# Altium PCB DT01.PcbDoc (part 1 of 3)
Units mil, origin at the board's own origin, x right, y up, seen from the top; angles counter-clockwise.
Board outline 2134.7 x 2226.1 mil, 2 copper layers (Top Layer, Bottom Layer), stack 57.918 mil thick; 95 components, 87 nets, 468 pads, 300 vias.
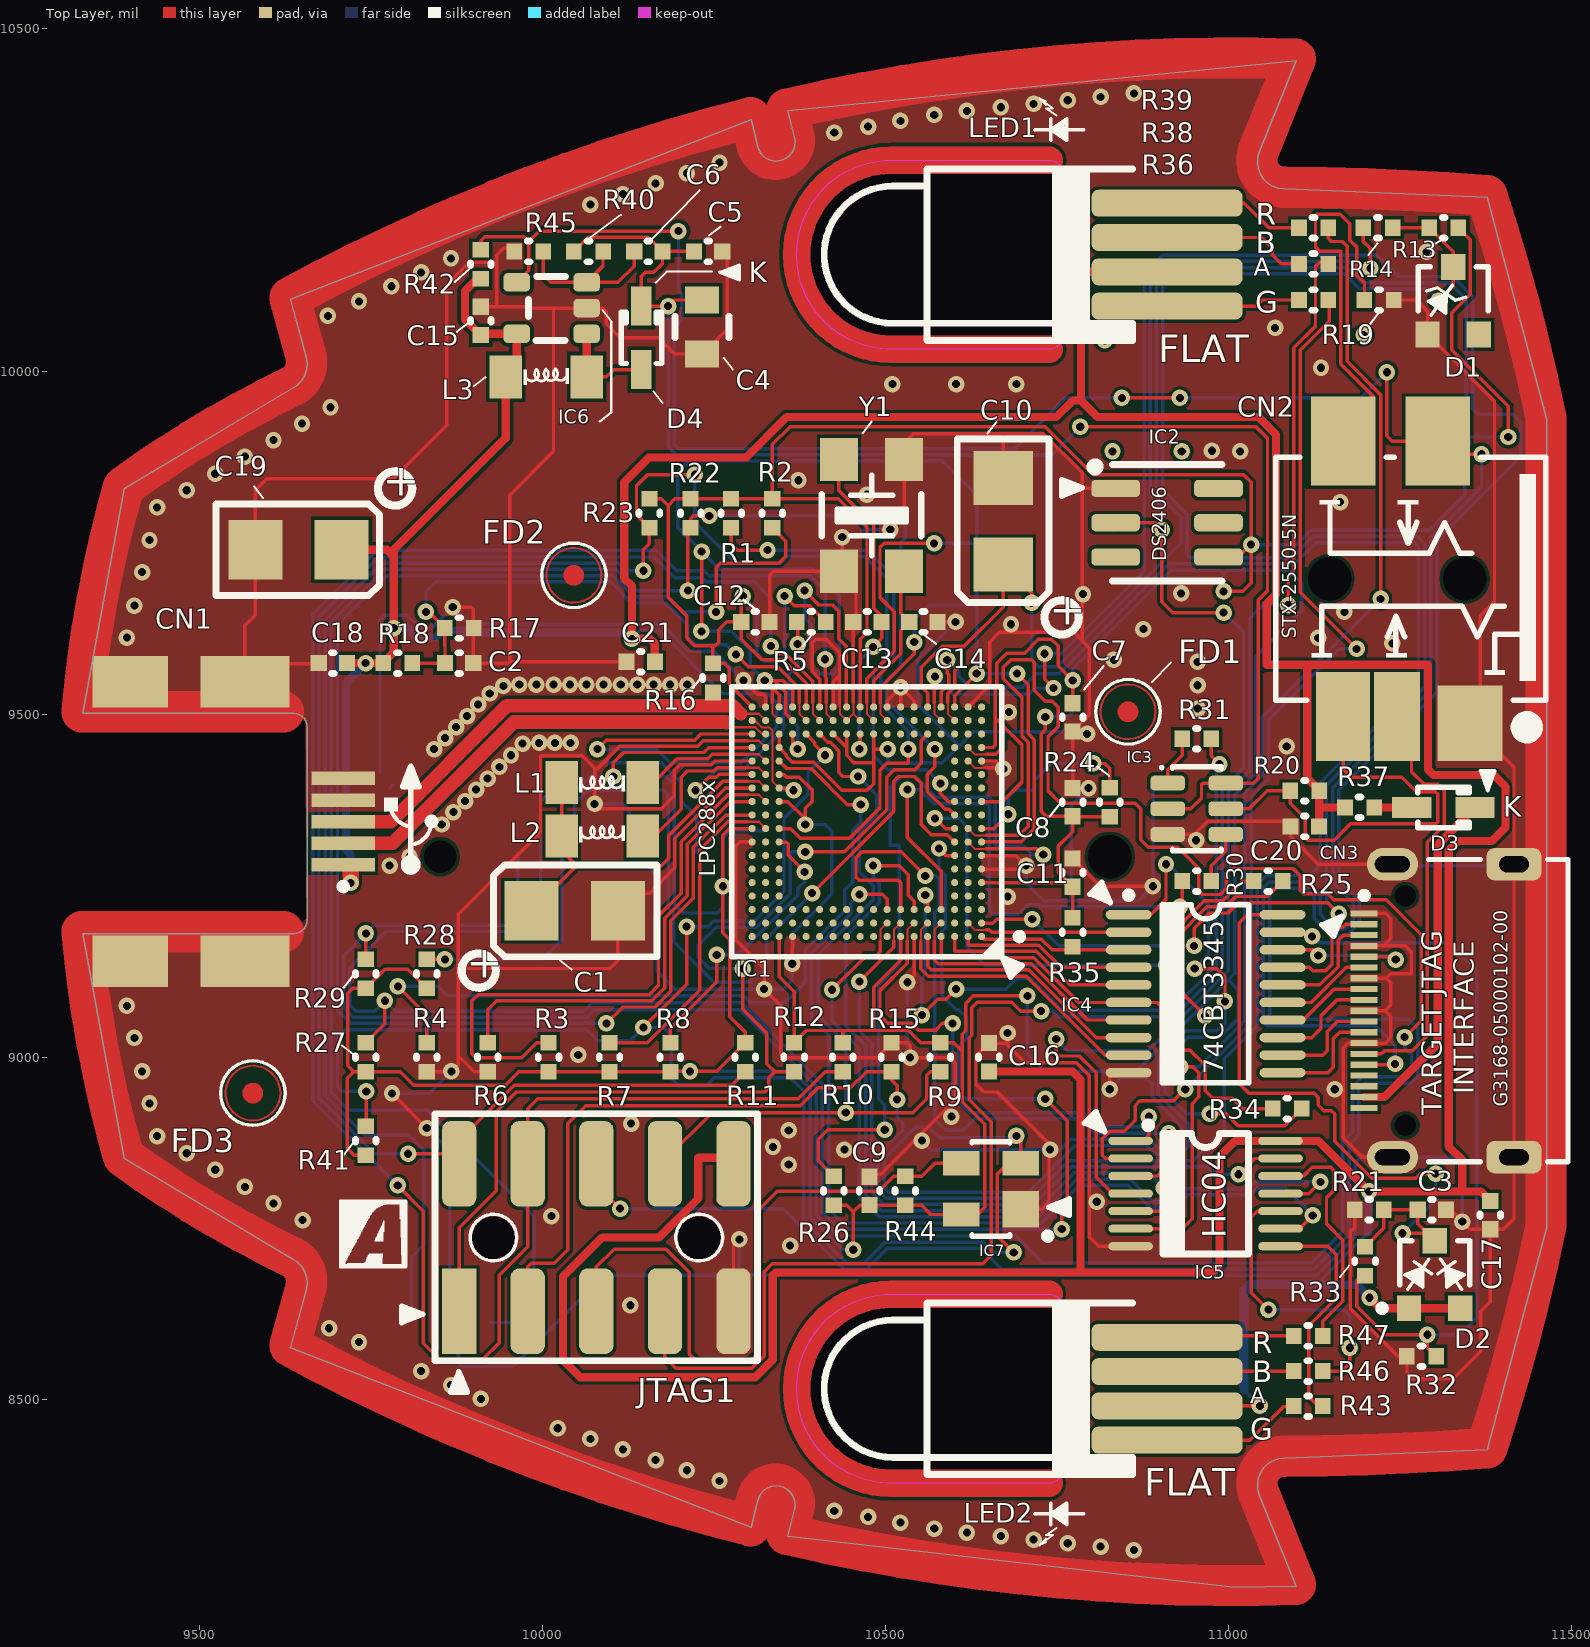
[diagram p0: Top Layer view]
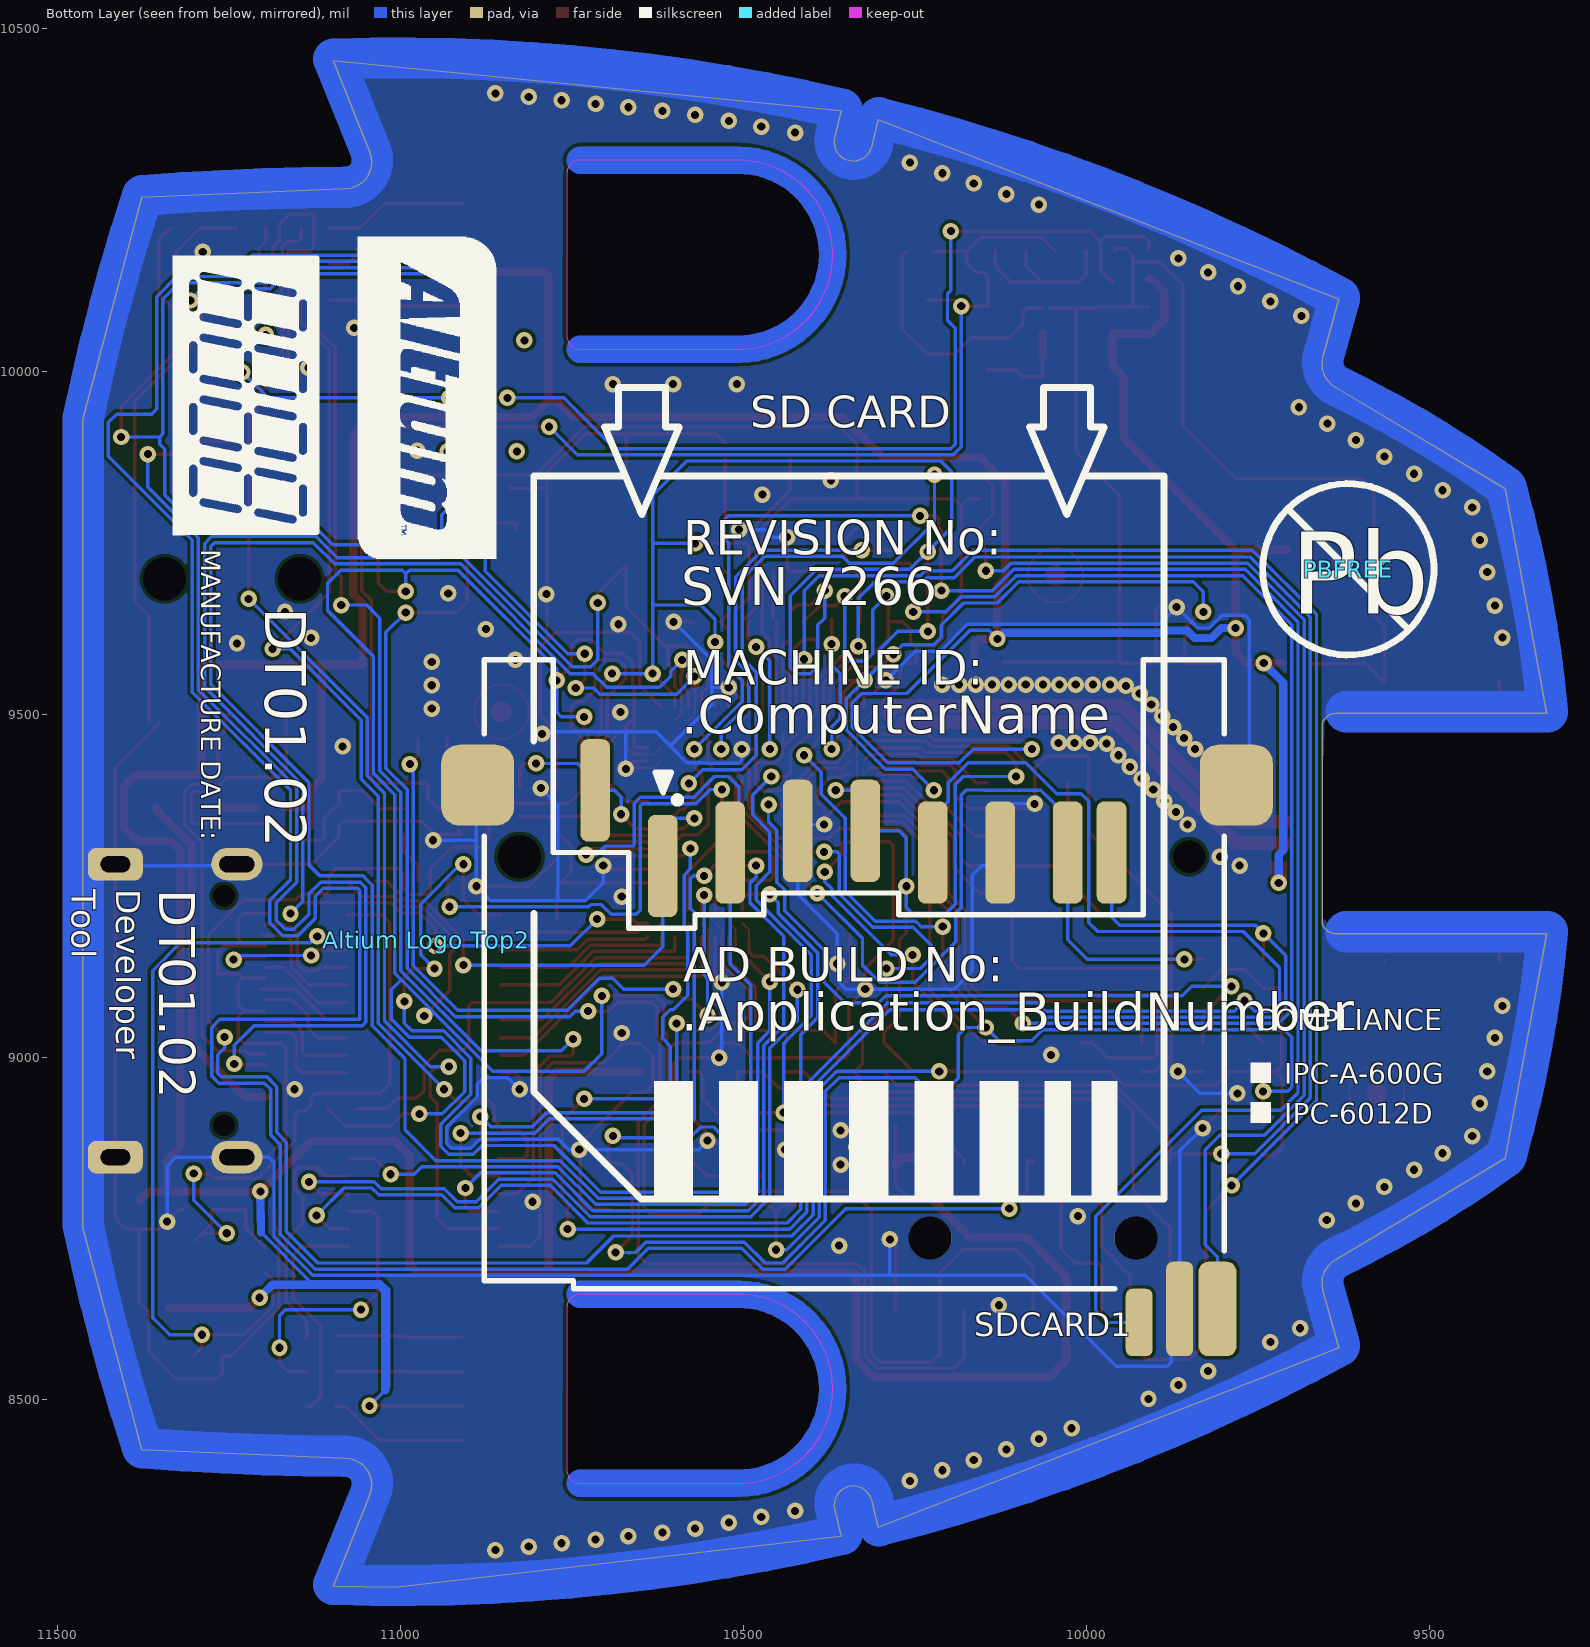
[diagram p1: Bottom Layer view, seen from below]

## Layer stack, top to bottom
Top Layer: signal copper 1.4
Dielectric: core 55.1181, FR-4, Dk 4.8
Bottom Layer: signal copper 1.4

## Board outline
9632.47,8576.36 9655.61,8660.1 9657,8669.12 9656.28,8678.21 9653.49,8686.9 9648.77,8694.71 9642.38,8701.23 9634.66,8706.09 9389.82,8852.38 9329.39,9180.02 9637.16,9180.02 9641.54,9180.52 9645.7,9181.97 9649.44,9184.32 9652.55,9187.43 9654.9,9191.17 9656.35,9195.33 9656.85,9199.71 9656.85,9481.2 9656.35,9485.58 9654.9,9489.74 9652.55,9493.48 9649.44,9496.59 9645.7,9498.94 9641.54,9500.39 9637.16,9500.89 9329.39,9500.89 9389.82,9828.53 9634.66,9974.82 9642.38,9979.68 9648.77,9986.2 9653.49,9994.01 9656.28,10002.7 9657,10011.79 9655.61,10020.81 9632.47,10104.55 10304.11,10366.84 10313.82,10327.29 10315.77,10321.87 10318.81,10316.97 10322.8,10312.81 10327.56,10309.57 10332.89,10307.39 10338.56,10306.37 10344.32,10306.55 10349.92,10307.93 10355.11,10310.43 10359.66,10313.96 10363.38,10318.36 10366.1,10323.44 10367.71,10328.97 10368.13,10334.72 10367.35,10340.43 10357.69,10379.8 11098.79,10452.79 11045.28,10319.67 11042.98,10311.48 11042.49,10302.98 11043.84,10294.58 11046.96,10286.67 11051.71,10279.61 11057.86,10273.73 11065.14,10269.32 11073.19,10266.57 11081.64,10265.62 11377.54,10253.65 11464.09,9929.39 11464.09,8751.52 11377.54,8427.26 11081.64,8415.29 11073.19,8414.34 11065.14,8411.59 11057.86,8407.18 11051.71,8401.3 11046.96,8394.24 11043.84,8386.33 11042.49,8377.93 11042.98,8369.43 11045.28,8361.24 11098.79,8228.12 11008.37,8226.7 10357.69,8301.11 10367.35,8340.48 10368.12,8345.97 10367.79,8351.49 10366.35,8356.84 10363.87,8361.79 10360.45,8366.15 10356.24,8369.74 10351.38,8372.41 10346.1,8374.06 10340.59,8374.61 10334.53,8373.94 10328.76,8371.95 10323.58,8368.74 10319.23,8364.47 10315.92,8359.35 10313.82,8353.62 10304.11,8314.07
cut-out: 10508.24,10032.02 cw(c10508.24,10169.82) 10508.24,10307.61 10738.55,10307.61 cw(c10738.55,10287.93) 10758.24,10287.93 10758.24,10051.71 cw(c10738.55,10051.71) 10738.55,10032.02
cut-out: 10508.24,8378.48 cw(c10508.24,8516.27) 10508.24,8654.07 10738.55,8654.07 cw(c10738.55,8634.38) 10758.24,8634.38 10758.24,8398.16 cw(c10738.55,8398.16) 10738.55,8378.48

## Design rules (kind name [scope] priority, off if disabled: settings)
Clearance [All] p1: gap=3
ComponentClearance [All] p1: gap=10 collisioncheckmode=3 verticalgap=9.21 showdistances=TRUE
FabricationTestPointUsage TestPointUsage [All] p1: valid=0 allowmultiple=FALSE
FabricationTestpoint Testpoint [All] p1: side=3 testpointundercomponent=TRUE minsize=40 maxsize=100 preferedsize=60 minholesize=0 maxholesize=40 preferedholesize=32 testpointgrid=1 allowsidetop=TRUE allowsidebottom=TRUE usegrid=TRUE gridtolerance=0.01
MinimumSolderMaskSliver [All] p1: minsoldermaskwidth=2.9
PolygonConnect [All] p1: connectstyle=Direct reliefconductorwidth=10 reliefentries=4 polygonreliefangle="90 Angle"
RoomDefinition U_Visual_Indicators [InComponentClass('U_Visual_Indicators')] p1: confinementstyle=ConfineIn formatcopy=TRUE lockcomponents=FALSE outline 10395.6,8376.32 10395.6,10309.87 11080.91,10309.87 11080.91,10239.02 11168.13,10239.02 11168.13,10073.73 11160.25,10073.73 11160.25,8460.95 11072.72,8460.95 11072.72,8376.32
RoomDefinition U_SD_Card_Socket [InComponentClass('U_SD_Card_Socket')] p2: confinementstyle=ConfineIn formatcopy=TRUE lockcomponents=FALSE outline 9712.34,8955.68 9712.34,9165.24 9717.12,9165.24 9717.12,9593.7 10125.87,9593.7 10125.87,9836.79 10245.89,9836.79 10245.89,9593.7 10952.72,9593.7 10952.72,9286.51 11102.19,9286.51 11102.19,9226.51 10952.72,9226.51 10952.72,8552.23 9717.12,8552.23 9717.12,8955.68
RoomDefinition U_Power_Bypass_Caps [InComponentClass('U_Power_Bypass_Caps')] p3: confinementstyle=ConfineIn formatcopy=TRUE lockcomponents=FALSE outline 9509.11,9657.72 9509.11,9821.58 10589.56,9821.58 10589.56,9916.06 10753.41,9916.06 10753.41,9539.11 10802.84,9539.11 10802.84,9366.21 11155.31,9366.21 11155.31,8813.39 11411.93,8813.39 11411.93,8725.43 11351.93,8725.43 11351.93,8760.87 10446.65,8760.87 10446.65,9544.34 9650.39,9544.34 9650.39,9657.72
RoomDefinition U_One-Wire_Write_Read [InComponentClass('U_One-Wire_Write_Read')] p4: confinementstyle=ConfineIn formatcopy=TRUE lockcomponents=FALSE outline 9879.87,10029.25 9879.87,10199.88 9935.73,10199.88 9935.73,10204.58 10285.46,10204.58 10285.46,10134.93 10286.91,10134.93 10286.91,10133.73 11263.57,10133.73 11263.57,9974.59 11553.33,9974.59 11553.33,9420.09 11155.33,9420.09 11155.33,9358.36 11032.72,9358.36 11032.72,9287.02 10997.89,9287.02 10997.89,9226.51 10909.89,9226.51 10909.89,9287.02 10875.07,9287.02 10875.07,9948.56 9911.14,9948.56 9911.14,10029.25
RoomDefinition U_Mini_USB_Socket [InComponentClass('U_Mini_USB_Socket')] p5: confinementstyle=ConfineIn formatcopy=TRUE lockcomponents=FALSE outline 9254.8,9090.36 9254.8,9595.84 9744.84,9595.84 9744.84,9604.34 9834.38,9604.34 9834.38,9655.51 9922.38,9655.51 9922.38,9596.67 10278.36,9596.67 10278.36,9508.67 9767.14,9508.67 9767.14,9090.36
RoomDefinition U_MCU_Debug [InComponentClass('U_MCU_Debug')] p6: confinementstyle=ConfineIn formatcopy=TRUE lockcomponents=FALSE outline 9816.28,8542.21 9816.28,8932.21 10336.28,8932.21 10336.28,8542.21
RoomDefinition U_MCU [InComponentClass('U_MCU')] p7: confinementstyle=ConfineIn formatcopy=TRUE lockcomponents=FALSE outline 9712.34,8834.13 9712.34,8922.13 9801.15,8922.13 9801.15,9043.68 9913.53,9043.68 9913.53,9295.14 9992.81,9295.14 9992.81,9458.72 10224.66,9458.72 10224.66,9591.16 10244.93,9591.16 10244.93,9836.79 10392.1,9836.79 10392.1,9914.33 10567.1,9914.33 10567.1,9664.36 10599.35,9664.36 10599.35,9591.16 10721.03,9591.16 10721.03,8890.64 10756.29,8890.64 10756.29,8719.06 10572.39,8719.06 10572.39,8760.85 10498.81,8760.85 10498.81,8834.13
RoomDefinition U_IO_Bus_Switch [InComponentClass('U_IO_Bus_Switch')] p8: confinementstyle=ConfineIn formatcopy=TRUE lockcomponents=FALSE outline 10742.84,9137.89 10742.84,9225.89 10799.23,9225.89 10799.23,9255.87 11134.19,9255.87 11134.19,8807.18 11340.68,8807.18 11340.68,8762.22 11367.35,8762.22 11367.35,8603.39 11325.56,8603.39 11325.56,8533.75 11237.56,8533.75 11237.56,8603.39 11204.12,8603.39 11204.12,8658.39 11169.29,8658.39 11169.29,8747.18 11161.19,8747.18 11041.74,8747.18 11041.74,8894.88 11041.74,8940.59 10799.23,8940.59 10799.23,9137.89
RoomDefinition U_Hard_Soft_JTAG_Socket [InComponentClass('U_Hard_Soft_JTAG_Socket')] p9: confinementstyle=ConfineIn formatcopy=TRUE lockcomponents=FALSE outline 11147.18,9334 11147.18,9394 11227.23,9394 11227.23,9407.23 11399.84,9407.23 11399.84,9316.28 11509.04,9316.28 11509.04,8818.87 11166.67,8818.87 11166.67,9334
RoomDefinition U_DT01_Mounts [InComponentClass('U_DT01_Mounts')] p10: confinementstyle=ConfineIn formatcopy=TRUE lockcomponents=FALSE outline 9518.12,8887.88 9518.12,9006.88 9518.12,9761.88 9986.12,9761.88 10105.12,9761.88 10105.12,9562.88 10913.12,9562.88 10913.12,9443.88 9637.12,9443.88 9637.12,8887.88
RoomDefinition DT01_ID [InComponentClass('DT01_ID')] p11: confinementstyle=ConfineIn formatcopy=TRUE lockcomponents=FALSE outline 10783.23,9679.01 10783.23,9882.81 11174.1,9882.81 11174.1,10239.02 11358.04,10239.02 11358.04,10182.16 11394.43,10182.16 11394.43,10023.33 11394.43,9679.01 11032.6,9679.01
RoutingVias [All] p1: holewidth=11.81 width=24 viastyle="Through Hole" minholewidth=11 minwidth=24 maxholewidth=12 maxwidth=28
SilkToSilkClearance SilkToSilkClearance_InvToFill [(ObjectKind = 'Text') And (TextKind <> 'Stroke Font') vs IsFill or Istrack] p1: silktosilkclearance=0
SilkToSilkClearance SilkToSilkClearance_Labels [(ObjectKind = 'Text') And (TextKind <> 'Stroke Font') vs (ObjectKind = 'Text') And (TextKind <> 'Stroke Font')] p2: silktosilkclearance=0
SilkToSilkClearance SilkToSilkClearance_Pb [(ObjectKind = 'Text') And (StringText = 'Pb') vs Istrack and onsilkscreen] p3: silktosilkclearance=0
SilkToSilkClearance SilkToSilkClearance_IC1 [incomponent('IC1') vs isdesignator] p4: silktosilkclearance=0
SilkToSilkClearance SilkToSilkClearance_+ [(ObjectKind = 'Text') And (StringText = '+') And (IsTextInverted = 'True') And (TextKind = 'TrueType Font') vs isarc and onsilkscreen] p5: silktosilkclearance=0
SilkToSilkClearance [All] p6: silktosilkclearance=4
SilkscreenOverComponentPads SilkscreenOverComponentPads_JTAG1 [isthrupin and InComponent('JTAG1') vs isarc and onsilkscreen] p1: minsilkscreentomaskgap=0
SilkscreenOverComponentPads SilkscreenOverComponentPads_LEDs [incomponent('LED1') or incomponent('LED2')] p2: minsilkscreentomaskgap=0
SilkscreenOverComponentPads [All] p3: minsilkscreentomaskgap=1
SolderMaskExpansion [All] p1: expansion=4
Width [All] p1: maxlimit=60 minlimit=3 preferedwidth=5
22 further rules are at their usual default settings.

## Classes and differential pairs
component class DT01_ID: D1 IC2 R13 R14
component class U_DT01_Mounts: FD1 FD2 FD3 PCB1
component class U_Hard_Soft_JTAG_Socket: CN3 D3 R37
component class U_IO_Bus_Switch: C3 D2 IC4 R21 R32 R33 R34 R35
component class U_MCU_Debug: JTAG1
component class U_MCU: C1 C13 C14 IC1 IC7 L1 L2 R1 R2 R3 R4 R5 R6 R7 R8 R9 R10 R11 R12 R15 R41 R44 Y1
component class U_Mini_USB_Socket: C2 CN1 R16 R17 R18
component class U_One-Wire_Write_Read: C4 C5 C6 C15 CN2 D4 IC3 IC6 L3 R19 R20 R30 R31 R40 R42 R45
component class U_Power_Bypass_Caps: C7 C8 C9 C10 C11 C12 C16 C17 C18 C19 C20 C21
component class U_SD_Card_Socket: R22 R23 R24 R25 R26 R27 R28 R29 SDCARD1
component class U_Visual_Indicators: IC5 LED1 LED2 R36 R38 R39 R43 R46 R47

## Components (designator, comment, footprint, x,y, rotation, side; value= is the part's Value field where it differs from the comment)
"Altium Logo Top2" "Generic No Pins" "NB2 ALTIUM LOGO" 10962.91,9170.78 r270 bottom (schematic designator "Altium Logo Top1")
C1 "47uF 10V" CAPC3528-STAR 10046.65,9213.21 r0 top locked (schematic designator C1_CP)
C2 "0.1uF 16V" CAPC1005-STAR 9878.38,9574.34 r180 top locked (schematic designator C1_US)
C3 "0.1uF 16V" CAPC1005-STAR 11296.7,8777.18 r0 top (schematic designator C13)
C4 "2.2uF 16V" CAPC2012-STAR 10232.62,10064.37 r90 top locked (schematic designator C3_12V)
C5 "0.1uF 16V" CAPC1005-STAR 10241.48,10174.58 r180 top locked (schematic designator C4_12V)
C6 "0.1uF 16V" CAPC1005-STAR 10154.22,10174.58 r0 top locked (schematic designator C2_12V)
C7 "0.1uF 16V" CAPC1005-STAR 10772.84,9495.13 r90 top locked (schematic designator C2_3V3)
C8 "0.1uF 16V" CAPC1005-STAR 10772.84,9371.64 r270 top (schematic designator C4_3V3)
C9 "0.1uF 16V" CAPC1005-STAR 10476.65,8804.85 r270 top locked (schematic designator C5_3V3)
C10 "47uF 10V" CAPC3528-STAR 10671.49,9780.98 r90 top locked (schematic designator C1_3V3)
C11 "0.1uF 16V" CAPC1005-STAR 10772.84,9268.82 r90 top (schematic designator C3_3V3)
C12 "0.1uF 16V" CAPC1005-STAR 10310.36,9634.36 r0 top locked (schematic designator C6_3V3)
C13 "39pF 50V 1005 COG" CAPC1005-STAR 10473.7,9634.36 r180 top locked (schematic designator C7_CP)
C14 "39pF 50V 1005 COG" CAPC1005-STAR 10555.37,9634.36 r0 top locked (schematic designator C8_CP)
C15 "0.1uF 16V" CAPC1005-STAR 9909.87,10073.23 r270 top locked (schematic designator C1_12V)
C16 "0.1uF 16V" CAPC1005-STAR 10650.82,8999.68 r270 top locked (schematic designator C2_5V0)
C17 "0.1uF 16V" CAPC1005-STAR 11381.93,8769.41 r90 top (schematic designator C4_5V0)
C18 "0.1uF 16V" CAPC1005-STAR 9694.37,9574.34 r0 top locked (schematic designator C5_5V0)
C19 "47uF 10V" CAPC3528-STAR 9644.19,9739.65 r180 top locked (schematic designator C1_5V0)
C20 "0.1uF 16V" CAPC1005-STAR 11111.33,9336.21 r180 top locked (schematic designator C3_5V0)
C21 "0.1uF 16V" CAPC1005-STAR 10143.08,9576.31 r180 top (schematic designator C6_5V0)
CN1 "0481900001" 481900001 9550.71,9343.1 r180 top locked (schematic designator CN1_US)
CN2 "PHONEJACK STEREO SW" STX-2550-5N-TR 11462.62,9697.34 r180 top locked
CN3 "HDMI19" G3168-0500XXXX-00 11455.73,9067.58 r0 top locked (schematic designator CN1)
D1 "3.3V" SOT95P230-3D 11327.81,10102.75 r0 top locked (schematic designator D1_ID)
D2 "BAV70TT1G" SOT95P230-3 11258.33,8628.59 r0 top (schematic designator D1)
D3 "ZHCS400" SOD323 11313.53,9363.76 r0 top locked (schematic designator D1_JTAG)
D4 "ZHCS400" SOD323 10144.06,10048.63 r90 top locked (schematic designator D1_12V)
FD1 "Fiducial - Round" "FIDUCIAL 2" 10853.62,9503.38 r90 top locked
FD2 "Fiducial - Round" "FIDUCIAL 2" 10045.62,9702.38 r90 top
FD3 "Fiducial - Round" "FIDUCIAL 2" 9577.62,8947.38 r90 top locked
IC1 "MC/ARM/LPC2888-SQ180" BGA50P18X18-180 9970.88,9844.94 r180 top locked (schematic designator IC1_CP)
IC2 "DS2406" TSOC6 10910.6,9779.01 r270 top locked (schematic designator IC1_ID)
IC3 "MAX4561" SOT23-6 10953.89,9361.98 r270 top locked (schematic designator IC1_1WB)
IC4 "SN74CBT3345CPWR" TSOP65P650-20 10966.71,9092.33 r0 top locked (schematic designator IC2)
IC5 "74VHC04" TSSOP14 10857.46,8877.66 r0 top locked (schematic designator IC1_LED)
IC6 "ZXLD1615" SOT-23-5 10064.36,10054.53 r90 top locked (schematic designator IC1_12V)
IC7 "MAX6315US26D1" SOT143 10653.77,8807.8 r90 top locked (schematic designator IC2_CP)
JTAG1 "TSM-105-01-S-DV" TSM-105-01-DV 9878.38,8844.21 r0 top locked (schematic designator JTAG)
L1 "10uH (LQH32CN100K33L)" 3261 10086.99,9400.17 r0 top locked (schematic designator L2_CP)
L2 "10uH (LQH32CN100K33L)" 3261 10086.99,9322.43 r0 top locked (schematic designator L1_CP)
L3 "10uH (LQH32CN100K33L)" 3261 10005.32,9991.56 r0 top locked (schematic designator L1_12V)
LED1 "RGB LED 5MM" LED-RGB-5MM-RA 10910.6,10244.87 r270 top locked
LED2 "RGB LED 5MM" LED-RGB-5MM-RA 10910.6,8591.32 r270 top locked
PBFREE "" LEAD_FREE_S 9618.6,9711.1 r180 bottom
R1 "4K7 1%" RESC1005-STAR 10274.93,9792.79 r90 top locked (schematic designator R13_CP)
R2 "4K7 1%" RESC1005-STAR 10334.96,9792.79 r90 top locked (schematic designator R14_CP)
R3 "4K7 1%" RESC1005-STAR 10008.76,8999.68 r270 top locked (schematic designator R4_CP)
R4 "12K 1%" RESC1005-STAR 9831.15,8999.68 r270 top (schematic designator R2_CP)
R5 "1K5 1%" RESC1005-STAR 10392.05,9634.36 r0 top (schematic designator R3_CP)
R6 "4K7 1%" RESC1005-STAR 9919.96,8999.68 r270 top locked (schematic designator R5_CP)
R7 "4K7 1%" RESC1005-STAR 10097.57,8999.68 r270 top locked (schematic designator R6_CP)
R8 "4K7 1%" RESC1005-STAR 10186.37,8999.68 r270 top locked (schematic designator R7_CP)
R9 "4K7 1%" RESC1005-STAR 10579.97,8999.68 r90 top locked (schematic designator R8_CP)
R10 "4K7 1%" RESC1005-STAR 10437.79,8999.68 r90 top locked (schematic designator R9_CP)
R11 "4K7 1%" RESC1005-STAR 10295.6,8999.68 r90 top locked (schematic designator R10_CP)
R12 "4K7 1%" RESC1005-STAR 10366.69,8999.68 r90 top locked (schematic designator R11_CP)
R13 "10K 1%" RESC1005-STAR 11314.04,10209.02 r0 top locked (schematic designator R1_ID)
R14 "1K 1%" RESC1005-STAR 11218.1,10209.02 r180 top locked (schematic designator R2_ID)
R15 "4K7 1%" RESC1005-STAR 10508.88,8999.68 r90 top locked (schematic designator R12_CP)
R16 "1M 1%" RESC1005-STAR 10248.36,9552.67 r90 top (schematic designator R1_US)
R17 "180K 1%" RESC1005-STAR 9878.38,9625.51 r0 top locked (schematic designator R3_US)
R18 "100K 1%" RESC1005-STAR 9788.84,9574.34 r180 top locked (schematic designator R2_US)
R19 "1K 1%" RESC1005-STAR 11219.57,10103.73 r0 top locked (schematic designator R4_1WB)
R20 "4K7 1%" RESC1005-STAR 11111.33,9388.36 r0 top locked (schematic designator R3_1WB)
R21 "1K 1%" RESC1005-STAR 11205.19,8777.18 r180 top (schematic designator R10)
R22 "4K7 1%" RESC1005-STAR 10215.89,9792.79 r90 top locked (schematic designator R15_CP)
R23 "4K7 1%" RESC1005-STAR 10155.87,9792.79 r90 top locked (schematic designator R16_CP)
R24 "4K7 1%" RESC1005-STAR 10826.95,9371.62 r270 top (schematic designator R17_CP)
R25 "4K7 1%" RESC1005-STAR 11058.19,9256.51 r0 top (schematic designator R18_CP)
R26 "4K7 1%" RESC1005-STAR 10424.49,8804.89 r270 top (schematic designator R19_CP)
R27 "4K7 1%" RESC1005-STAR 9742.34,8999.68 r270 top (schematic designator R20_CP)
R28 "4K7 1%" RESC1005-STAR 9831.15,9121.24 r270 top (schematic designator R21_CP)
R29 "4K7 1%" RESC1005-STAR 9742.34,9121.24 r270 top (schematic designator R22_CP)
R30 "100R 1%" RESC1005-STAR 10953.89,9256.51 r0 top (schematic designator R1_1WB)
R31 "100R 1%" RESC1005-STAR 10953.89,9464.13 r180 top locked (schematic designator R2_1WB)
R32 "4K7 1%" RESC1005-STAR 11281.56,8563.75 r0 top (schematic designator R27)
R33 "4K7 1%" RESC1005-STAR 11199.29,8702.39 r270 top (schematic designator R28)
R34 "4K7 1%" RESC1005-STAR 11085.74,8924.88 r0 top (schematic designator R26_CP)
R35 "4K7 1%" RESC1005-STAR 10772.84,9181.89 r90 top (schematic designator R25_CP)
R36 "150R 1%" RESC1005-STAR 11124.13,10103.73 r0 top locked (schematic designator R1_LED)
R37 "150R 1%" RESC1005-STAR 11191.18,9364 r0 top (schematic designator R1)
R38 "150R 1%" RESC1005-STAR 11124.13,10156.37 r0 top locked (schematic designator R2_LED)
R39 "150R 1%" RESC1005-STAR 11124.13,10209.02 r0 top locked (schematic designator R3_LED)
R40 "1M 1%" RESC1005-STAR 10066.99,10174.58 r180 top locked (schematic designator R2_12V)
R41 "4K7 1%" RESC1005-STAR 9742.34,8878.13 r270 top (schematic designator R23_CP)
R42 "10K 1%" RESC1005-STAR 9909.87,10155.88 r90 top locked (schematic designator R3_12V)
R43 "150R 1%" RESC1005-STAR 11116.25,8490.95 r0 top locked (schematic designator R4_LED)
R44 "4K7 1%" RESC1005-STAR 10528.81,8804.85 r270 top locked (schematic designator R1_CP)
R45 "91K 1%" RESC1005-STAR 9979.73,10174.58 r0 top locked (schematic designator R1_12V)
R46 "150R 1%" RESC1005-STAR 11116.25,8542.12 r0 top locked (schematic designator R5_LED)
R47 "150R 1%" RESC1005-STAR 11116.25,8593.29 r0 top (schematic designator R6_LED)
SDCARD1 "SDAMB-012" SDAMB-012 10334.92,9004.68 r0 bottom locked (schematic designator SDCARD)
Y1 "12MHz XTAL" XTAL-200X126-4 10479.6,9789.83 r270 top locked (schematic designator Y1_CP)

## Footprints (in the part's own frame and the unit in brackets; to place one, negate y for a bottom-side part, rotate by r counter-clockwise, add the part's x,y. Pads: shape width x height; smd on the part's side, far side on the other; paste and mask are expansions set on the pad)
3261 [mm] "3216 Chip; Chip Inductor; Body 3.2 x 1.6 mm (LxW typ)"
  rect 1.2x1.6 smd paste+0.038 mask+0.038: 1(-1.5,0) 2(1.5,0)
  body extent -1.63,-0.77 1.7,1.23, height 1.73
481900001 [mm] "Connector; USB Mini-B, Sinking Type, SM; 5 Position; Right Angle"
  rect 2.35x0.5 smd paste+0.038 mask+0.038: 1(-4.03,1.6) 2(-4.03,0.8) 3(-4.03,0) 4(-4.03,-0.8) 5(-4.03,-1.6)
  rect 3.302x1.905 smd paste+0.038 mask+0.038: MH1(-0.387,-5.175) MH4(-0.387,5.175)
  rect 2.794x1.905 smd paste+0.038 mask+0.038: MH2(3.863,-5.175) MH3(3.863,5.175)
  silkscreen extent -4.16,2.28 -3.91,2.52, body extent -4.5,-5.55 6.51,5.45, height 1.4
BGA50P18X18-180 [mil] "BGA, 180-Leads, Body 10x10mm, Pitch 0.5mm"
  round 10.5 smd paste+1.5 mask+1.5: A1(-669.29,669.29) A2(-649.61,669.29) A3(-629.92,669.29) A4(-610.24,669.29) A5(-590.55,669.29) A6(-570.87,669.29) A7(-551.18,669.29) A8(-531.5,669.29) A9(-511.81,669.29) A10(-492.13,669.29) A11(-472.44,669.29) A12(-452.76,669.29) A13(-433.07,669.29) A14(-413.39,669.29) A15(-393.7,669.29) A16(-374.02,669.29) A17(-354.33,669.29) A18(-334.65,669.29) B1(-669.29,649.61) B2(-649.61,649.61) B3(-629.92,649.61) B4(-610.24,649.61) B5(-590.55,649.61) B6(-570.87,649.61) B7(-551.18,649.61) B8(-531.5,649.61) B9(-511.81,649.61) B10(-492.13,649.61) B11(-472.44,649.61) B12(-452.76,649.61) B13(-433.07,649.61) B14(-413.39,649.61) B15(-393.7,649.61) B16(-374.02,649.61) B17(-354.33,649.61) B18(-334.65,649.61) C1(-669.29,629.92) C2(-649.61,629.92) C3(-629.92,629.92) C4(-610.24,629.92) C5(-590.55,629.92) C6(-570.87,629.92) C7(-551.18,629.92) C8(-531.5,629.92) C9(-511.81,629.92) C10(-492.13,629.92) C11(-472.44,629.92) C12(-452.76,629.92) C13(-433.07,629.92) C14(-413.39,629.92) C15(-393.7,629.92) C16(-374.02,629.92) C17(-354.33,629.92) C18(-334.65,629.92) D1(-669.29,610.24) D2(-649.61,610.24) D3(-629.92,610.24) D16(-374.02,610.24) D17(-354.33,610.24) D18(-334.65,610.24) E1(-669.29,590.55) E2(-649.61,590.55) E3(-629.92,590.55) E16(-374.02,590.55) E17(-354.33,590.55) E18(-334.65,590.55) F1(-669.29,570.87) F2(-649.61,570.87) F3(-629.92,570.87) F16(-374.02,570.87) F17(-354.33,570.87) F18(-334.65,570.87) G1(-669.29,551.18) G2(-649.61,551.18) G3(-629.92,551.18) G16(-374.02,551.18) G17(-354.33,551.18) G18(-334.65,551.18) H1(-669.29,531.5) H2(-649.61,531.5) H3(-629.92,531.5) H16(-374.02,531.5) H17(-354.33,531.5) H18(-334.65,531.5) J1(-669.29,511.81) J2(-649.61,511.81) J3(-629.92,511.81) J16(-374.02,511.81) J17(-354.33,511.81) J18(-334.65,511.81) K1(-669.29,492.13) K2(-649.61,492.13) K3(-629.92,492.13) K16(-374.02,492.13) K17(-354.33,492.13) K18(-334.65,492.13) L1(-669.29,472.44) L2(-649.61,472.44) L3(-629.92,472.44) L16(-374.02,472.44) L17(-354.33,472.44) L18(-334.65,472.44) M1(-669.29,452.76) M2(-649.61,452.76) M3(-629.92,452.76) M16(-374.02,452.76) M17(-354.33,452.76) M18(-334.65,452.76) N1(-669.29,433.07) N2(-649.61,433.07) N3(-629.92,433.07) N16(-374.02,433.07) N17(-354.33,433.07) N18(-334.65,433.07) P1(-669.29,413.39) P2(-649.61,413.39) P3(-629.92,413.39) P16(-374.02,413.39) P17(-354.33,413.39) P18(-334.65,413.39) R1(-669.29,393.7) R2(-649.61,393.7) R3(-629.92,393.7) R16(-374.02,393.7) R17(-354.33,393.7) R18(-334.65,393.7) T1(-669.29,374.02) T2(-649.61,374.02) T3(-629.92,374.02) T4(-610.24,374.02) T5(-590.55,374.02) T6(-570.87,374.02) T7(-551.18,374.02) T8(-531.5,374.02) T9(-511.81,374.02) T10(-492.13,374.02) T11(-472.44,374.02) T12(-452.76,374.02) T13(-433.07,374.02) T14(-413.39,374.02) T15(-393.7,374.02) T16(-374.02,374.02) T17(-354.33,374.02) T18(-334.65,374.02) U1(-669.29,354.33) U2(-649.61,354.33) U3(-629.92,354.33) U4(-610.24,354.33) U5(-590.55,354.33) U6(-570.87,354.33) U7(-551.18,354.33) U8(-531.5,354.33) U9(-511.81,354.33) U10(-492.13,354.33) U11(-472.44,354.33) U12(-452.76,354.33) U13(-433.07,354.33) U14(-413.39,354.33) U15(-393.7,354.33) U16(-374.02,354.33) U17(-354.33,354.33) U18(-334.65,354.33) V1(-669.29,334.65) V2(-649.61,334.65) V3(-629.92,334.65) V4(-610.24,334.65) V5(-590.55,334.65) V6(-570.87,334.65) V7(-551.18,334.65) V8(-531.5,334.65) V9(-511.81,334.65) V10(-492.13,334.65) V11(-472.44,334.65) V12(-452.76,334.65) V13(-433.07,334.65) V14(-413.39,334.65) V15(-393.7,334.65) V16(-374.02,334.65) V17(-354.33,334.65) V18(-334.65,334.65)
  silkscreen extent -729,305 -305,699, body extent -701,304 -305,700, height 20
CAPC1005-STAR [mm] "Chip Capacitor 1005"
  rect 0.6x0.6 smd paste+0.038 mask+0.038: 1(-0.525,0) 2(0.525,0)
  silkscreen extent -0.05,-0.38 0.05,0.38, body extent -0.76,-0.25 0.76,0.26, height 0.13
CAPC2012-STAR [mm] "0805 Capacitor SMD - Startronics"
  rrect0% 1x1.25 smd paste+0.038 mask+0.038: 1(-1,0) 2(1,0)
  silkscreen extent -0.4,-1 0.4,1, body extent -1.32,-0.55 1.24,0.6, height 0.13
CAPC3528-STAR [mm] "Capacitor 3.5x2.8mm (B-Case)"
  rect 2x2.2 smd paste+0.038 mask+0.038: 1(-1.6,0) 2(1.6,0)
  silkscreen extent -3,-1.7 3.05,1.7, body extent -1.77,-1.41 1.79,1.41, height 0.65
"FIDUCIAL 2" [mil]
  Top Layer circle w3: c0,0 r40
  Top Layer circle w18: c0,0 r6
  silkscreen extent -47,-47 47,47
G3168-0500XXXX-00 [mm] "3168 Series HDMI Type C, Female, Right-Angle, SMT"
  rect 1x0.23 smd paste+0.038 mask+0.038: 1(-6.55,3.6) 2(-6.55,3.2) 3(-6.55,2.8) 4(-6.55,2.4) 5(-6.55,2) 6(-6.55,1.6) 7(-6.55,1.2) 8(-6.55,0.8) 9(-6.55,0.4) 10(-6.55,0) 11(-6.55,-0.4) 12(-6.55,-0.8) 13(-6.55,-1.2) 14(-6.55,-1.6) 15(-6.55,-2) 16(-6.55,-2.4) 17(-6.55,-2.8) 18(-6.55,-3.2) 19(-6.55,-3.6)
  oval 1.9x1.2 hole 0.6 slot 1.3 at 0 deg paste+0.038 mask+0.038: MH1(-5.5,-5.425) MH4(-5.5,5.425)
  rrect50% 2.032x1.2 hole 0.6 slot 1.1 at 0 deg paste+0.038 mask+0.038: MH2(-1,-5.425) MH3(-1,5.425)
  round 0.5 hole 0.8 unplated paste+0.038 mask+0.038: MH5(-5.025,-4.25) MH6(-5.025,4.25)
  silkscreen extent -6.67,-5.6 1,5.6, body extent -6.25,-5.6 1,5.6, height 2.67
LEAD_FREE_S [mil]
  silkscreen extent -125,-125 125,125
LED-RGB-5MM-RA [mil] "LED RGB Right Angle 5mm"
  rrect50% 39.37x220 smd paste+1.5 mask+1.5: A(100,0) B(50,0) G(150,0) R(0,0)
  silkscreen extent -50,-500 200,-50, body extent -25,-487 174,97, height 100
"NB2 ALTIUM LOGO" [mil]
  silkscreen extent -1025,-99 -556,102
RESC1005-STAR [mm] "Chip Inductor 1005"
  rect 0.575x0.6 smd paste+0.038 mask+0.038: 1(-0.538,0) 2(0.538,0)
  silkscreen extent -0.05,-0.38 0.05,0.38, body extent -0.71,-0.25 0.71,0.25, height 0.25
SDAMB-012 [mm] "Connector; SD Card Type A, SM, 9 Position, Right Angle, Pitch 2.5 mm, Body 23.3 x 27.4 x 3.4 mm (LxWxH)"
  rrect50% 1.1x3.79 smd paste+0.038 mask+0.038: 1(7.2,-6.955) 2(4.7,-7.455) 3(2.2,-8.255) 4(-0.3,-8.255) 5(-2.8,-7.455) 6(-5.3,-7.455) 7(-7.8,-7.455) 8(-9.425,-7.455) 9(9.7,-9.755)
  rrect50% 2.7x3 smd paste+0.038 mask+0.038: MH1(14.05,-9.95) MH2(-14.05,-9.95)
  round 0.9 hole 1.2 unplated paste+0.038 mask+0.038: MH3(-12.3,-7.3)
  round 1.3 hole 1.6 unplated paste+0.038 mask+0.038: MH4(12.5,-7.3)
  rrect50% 1x3.5 smd paste+0.038 mask+0.038: SW1(-11.95,9.45)
  rrect50% 1.4x3.5 smd paste+0.038 mask+0.038: SW2(-13.35,9.45)
  rrect50% 1x2.5 smd paste+0.038 mask+0.038: SW3(-10.45,9.95)
  silkscreen extent -13.6,-14.6 13.8,8.7, body extent -13.6,-14.71 13.8,8.7, height 2.79
SOD323 [mm] "SOD-323/SC-76; 2 Leads; Body 1.7 x 1.3 mm, (LxW)"
  rect 1.45x0.762 smd paste+0.038 mask+0.038: 1(-1.175,0) 2(1.175,0)
  silkscreen extent -0.95,-0.75 0.95,0.75, body extent -0.97,-0.74 0.99,0.66, height 0.51
SOT23-6 [mm] "SOT-23/SC-74A; 5 Leads; Body 3.1 x 3 mm, inc. leads (LxW max)"
  rrect50% 0.55x1.27 smd paste+0.038 mask+0.038: 1(-0.95,-1.075) 2(0,-1.075) 3(0.95,-1.075) 4(0.95,1.075) 5(0,1.075) 6(-0.95,1.075)
  silkscreen extent -1.57,-1.35 1.55,0.9, body extent -1.3,-1.32 1.3,1.27, height 0.51
SOT95P230-3 [mm]
  rect 0.9x0.95 smd paste+0.038 mask+0.038: 1(0.127,0.127) 2(2.027,0.127) 3(1.077,2.627)
  silkscreen extent -1,0 2.38,2.63, body extent -0.18,-0.05 2.13,2.56, height 0.38
SOT95P230-3D [mm] "SOT23, 1=bottom-left, 2=top, 3=bottom-right"
  rect 0.9x0.95 smd paste+0.038 mask+0.038: 1(-0.95,-1.25) 2(0,1.25) 3(0.95,-1.25)
  silkscreen extent -1.3,-0.38 1.3,1.25, body extent -1.17,-1.35 1.14,1.29, height 0.38
SOT143 [mm] "SOT-143; 4 Leads; Body 3 x 2.6 mm, inc. leads (LxW max)"
  rect 1.35x1.35 smd paste+0.038 mask+0.038: 1(-0.75,-1.1)
  rect 0.9x1.35 smd paste+0.038 mask+0.038: 2(0.95,-1.1) 3(0.95,1.1) 4(-0.95,1.1)
  silkscreen extent -1.87,-2.23 1.75,0.7, body extent -1.5,-1.29 1.55,1.27, height 0.38
SOT-23-5 [mil] "SOT-23-5, 5-lead Small Outline Package"
  rrect50% 27x39 smd paste+1.5 mask+1.5: 1(0,0) 2(37.5,0) 3(75,0) 4(75,102) 5(0,102)
  silkscreen extent -10,31 83,85, body extent -4,2 80,104, height 10
STX-2550-5N-TR [mm] "STX-2550 Series Surface Mount 2.5mm Audio Jack"
  rect 2.4x2.8 smd paste+0.038 mask+0.038: 1(2.8,5.35)
  rect 2.4x3.3 smd paste+0.038 mask+0.038: 2(7.5,-5.1) 4(4,-5.1)
  rect 2x3.3 smd paste+0.038 mask+0.038: 3(7.5,5.1)
  rect 1.7x3.3 smd paste+0.038 mask+0.038: 5(5.5,5.1)
  round 1.3 hole 1.6 unplated paste+0.038 mask+0.038: MH1(3,0) MH2(8,0)
  silkscreen extent 0,-4.5 10,5.8, body extent -1.87,-4.49 9.99,4.45, height 4
TSM-105-01-DV [mil] "SMT 100mil space smt pin header"
  rect 50x125 smd paste+1.5 mask+1.5: 1(0,-215)
  rrect50% 50x125 smd paste+1.5 mask+1.5: 2(0,0) 3(100,-215) 4(100,0) 5(200,-215) 6(200,0) 7(300,-215) 8(300,0) 9(400,-215) 10(400,0)
  round 62.2 hole 62.99 paste+1.5 mask+1.5: PEGA(50,-108) PEGB(350,-108)
  silkscreen extent -35,-287 435,73, body extent -52,-253 448,37, height 380
TSOC6 [mil]
  rrect50% 25x71 smd paste+1.5 mask+1.5: 1(-50,-75) 2(0,-75) 3(50,-75) 4(50,75) 5(0,75) 6(-50,75)
  silkscreen extent -86,-110 85,80, body extent -82,-87 80,95, height 30
TSOP65P650-20 [mm] "TSOP, 20-Leads, Body 6.5x4.4mm, Pitch 0.65mm, IPC Medium Density"
  oval 1.7x0.35 smd paste+0.038 mask+0.038: 1(-2.85,2.925) 2(-2.85,2.275) 3(-2.85,1.625) 4(-2.85,0.975) 5(-2.85,0.325) 6(-2.85,-0.325) 7(-2.85,-0.975) 8(-2.85,-1.625) 9(-2.85,-2.275) 10(-2.85,-2.925) 11(2.85,-2.925) 12(2.85,-2.275) 13(2.85,-1.625) 14(2.85,-0.975) 15(2.85,-0.325) 16(2.85,0.325) 17(2.85,0.975) 18(2.85,1.625) 19(2.85,2.275) 20(2.85,2.925)
  silkscreen extent -2.97,-3.3 1.6,3.77, body extent -2.25,-3.3 2.25,3.3, height 1.2
TSSOP14 [mm]
  oval 1.65x0.3 smd paste+0.038 mask+0.038: 1(0,0) 2(0,-0.65) 3(0,-1.3) 4(0,-1.95) 5(0,-2.6) 6(0,-3.25) 7(0,-3.9) 8(5.55,-3.9) 9(5.55,-3.25) 10(5.55,-2.6) 11(5.55,-1.95) 12(5.55,-1.3) 13(5.55,-0.65) 14(5.55,0)
  silkscreen extent 0.52,-4.19 4.37,0.7, body extent -0.21,-4.45 6.18,0.56, height 0.64
XTAL-200X126-4 [mil] "CRYSTAL SMD 200x126x44 mils, 4 pads"
  rect 63x55 smd paste+1.5 mask+1.5: 1(-81.5,-47.5) 2(81.5,-47.5) 3(81.5,47.5) 4(-81.5,47.5)
  silkscreen extent -31,-72 31,72, body extent -82,-66 81,73, height 35

## Part data
C1 C10 C19: library part D-101-0001, "Capacitor, Tantalum, 47uF 20% 10V MCCT-B (3528-12)"
C2 C3 C5 C6 C7 C8 C9 C11 C12 C15 C16 C17 C18 C20 C21: library part D-101-0080, "Capacitor, Ceramic, 0.1uF 10% 16V 0402 (1005) X7R"
C4: library part D-101-0000, "Capacitor, Ceramic, 2.2uF 10% 16V 0805 (2012) X5R"
C13 C14: library part D-101-0089, "Capacitor, Ceramic, 18pF 5% 50V 0402 (1005) COG"
CN1: library part D-300-0034, "USB On-The-Go (OTG) Mini-B Receptacle, Right Angle, SMT, 0.80mm (.031\") Pitch, Solder Tabs with Back Cover, Recessed Type"
CN2: library part D-300-0059
CN3: library part D-300-0058, "HDMI Socket; 19 Pin"
D1: library part D-150-0005, "Zener Diode, 3.3V"
D2: library part D-155-0000, "Dual Switching Diode"
D3 D4: library part D-151-0004, "Schottky Diode, 400mA"
FD1 FD2 FD3: library part D-004-0001, "Fiducial - Round 1.5mm Top-Bottom"
IC1: library part D-242-0001, "16/32-bit ARM microcontrollers; 8 kB cache, up to 1 MB flash,  High Speed USB 2.0 device, and SDRAM memory interface"
IC2: library part D-263-0002, "Dual Addressable Switch Plus 1KB Memory"
IC3: library part D-200-0003, "±15kV ESD-Protected, Low-Voltage,  SPDT, CMOS Analog Switches"
IC4: library part D-205-0005, "SN74CBT3345CPWR; HIGH SPEED 8-BIT BUS SWITCH"
IC5: library part D-205-0004, "HEX Inverter"
IC6: library part D-204-0017, "ADJUSTABLE DC-DC BOOST CONVERTER WITH INTERNAL SWITCH IN  TSOT23-5"
IC7: library part D-243-0000, "MAX6315, Open-Drain Output SOT Reset IC, Customized Reset Thresholds, Timeout Delays"
JTAG1: library part D-300-0076, "Non-Boxed Header IDC, 2 X 5 Pin SMD"
L1 L2 L3: library part D-102-0011, "Inductor, 10uH, 450mA, 0.3R, 1210 (3225) LQH32CN100K33L"
LED1 LED2: library part D-153-0001, "LED, RGB, 5mm, 540R2GBC-CA, Common Anode"
R1 R2 R3 R6 R7 R8 R9 R10 R11 R12 R15 R20 R22 R23 R24 R25 R26 R27 R28 R29 R32 R33 R34 R35 R41 R44: library part D-100-0088, "Resistor, 4K7 1% 0402 (1005)"
R4: library part D-100-0002, "Resistor, 12K 1% 0402"
R5: library part D-100-0003, "Resistor, 1K5 1% 0402"
R13 R42: library part D-100-0130, "Resistor, 10K 1% 0402 (1005)"
R14 R19 R21: library part D-100-0121, "Resistor, 1K 1% 0402 (1005)"
R16 R40: library part D-100-0075, "Resistor, 1M 1% 0402"
R17: library part D-100-0006, "Resistor, 180K 1% 0402 (1005)"
R18: library part D-100-0132, "Resistor, 100K 1% 0402 (1005)"
R30 R31: library part D-100-0131, "Resistor, 100R 1% 0402 (1005)"
R36 R37 R38 R39 R43 R46 R47: library part D-100-0005, "Resistor, 150R 1% 0402 (1005)"
R45: library part D-100-0073, "Resistor, 91K 1% 0402"
SDCARD1: library part D-300-0018, "SDCARD Connector SDAMB-012"
Y1: library part D-103-0029, "Crystal, SMD, 12.000000MHz Stab=50ppm 10.0pF"

## Via types
v1: diameter 24, hole 11.81, Top Layer to Bottom Layer, tented both sides, 295 vias
v2: diameter 24.02, hole 11.81, Top Layer to Bottom Layer, tented both sides, 5 vias

## Nets (pads, with @x,y where several pads share a name; then routed paths per layer and width w, separated by ;. In a path a pad name is that pad's centre, name@x,y a point inside that pad or via, vN(x,y) a via of type N, cw(c..) or ccw(c..) an arc to the next point about the centre after c; other vN are vias at no path point)
1V8: IC1.H1 IC1.N18 IC1.U8 IC1.U9 IC1.U15 IC1.U16 IC1.V3 IC1.V11 IC1.V15 IC1.V16 | length 3545.7
  Top Layer w3: 10335,9520.1 10335,9500.5 IC1.U16@10344.89,9490.61 ; 10472.8,9516.79 10472.8,9500.5 IC1.U9@10482.69,9490.61 ; 10492.48,9516.79 10492.48,9500.5 IC1.U8@10502.37,9490.61
  Top Layer w5: v1(10223.01,9389.02) 10242.01,9408.02 10253.46,9408.02 10257.46,9412.02 10305.38,9412.02 IC1.N18@10305.52,9411.87 ; v1(10231.63,9620.57) 10232.01,9620.94 v1(10232.01,9737.02) ; 10335,9516.79 10335,9538.02 ; 10344.9,9519.02 IC1.V16@10344.89,9510.29 10344.89,9528.13 10335,9538.02 ; IC1.U15@10364.58,9490.61 10354.63,9500.55 10354.63,9532.01 10337.62,9549.02 ; v1(10382.01,9680.02) 10403.01,9659.02 10423.01,9659.02 10432.01,9650.02 10432.01,9610.02 10443.01,9599.02 10443.01,9510.29 IC1.V11@10443.32,9510.29 ; 10472.8,9516.79 10472.8,9551.81 10513.01,9592.02 10513.01,9649.02 10492.01,9670.02 10492.01,9743.02 10498.01,9749.02 v1(10571.01,9749.02) ; 10492.48,9516.79 10492.48,9538.5 10542.01,9588.02 v1(10542.01,9605.02) ; IC1.V3@10600.8,9510.29 10600.8,9526.81 v1(10633.01,9559.02) ; IC1.H1@10640.17,9313.44 10643.01,9313.44 10643.01,9314.02 10698.01,9314.02 10717.01,9333.02 10717.01,9462.73 10708.01,9471.73 10708.01,9543.02 v1(10692.01,9559.02) ; 10335,9538.02 v1(10324.01,9549.02) 10337.62,9549.02 ; 10337.62,9549.02 10350.28,9549.02 10364.58,9534.72 IC1.V15@10364.58,9512.45 ; IC1.V15@10364.58,9512.45 IC1.V15@10364.58,9510.29 10364.58,9509.02 10367.01,9509.02 10367.01,9510.02 10365.65,9511.37 IC1.V15@10364.58,9512.45
  Bottom Layer w5: v1(10223.01,9389.02) 10253.82,9419.83 10293.62,9419.83 10350.7,9476.9 10350.7,9522.33 v1(10324.01,9549.02) 10302.91,9570.12 10302.91,9593.09 10275.43,9620.57 v1(10231.63,9620.57) ; v1(10382.01,9680.02) 10382.01,9640.02 10392.01,9630.02 10392.01,9570.02 10403.01,9559.02 10423.01,9559.02 10432.37,9568.38 10432.37,9672.38 10393.75,9711 10258.02,9711 v1(10232.01,9737.02) 10197.01,9772.02 10197.01,9853.02 10213.01,9869.02 10583.01,9869.02 10633.01,9819.02 10633.01,9749.02 ; v1(10542.01,9605.02) 10542.01,9638.02 10563.01,9659.02 10633.01,9659.02 ; v1(10571.01,9749.02) 10633.01,9749.02 ; v1(10692.01,9559.02) v1(10633.01,9559.02) 10633.01,9659.02 ; 10633.01,9659.02 10633.01,9749.02
1WB: IC1.C4 R30.1 | length 810.5
  Top Layer w5: v1(10532.01,9390.02) 10532.01,9320.02 10581.12,9270.91 IC1.C4@10581.11,9215.02 ; R30.1@10927.01,9259.02 10932.71,9259.02 R30.1@10932.71,9256.51 10932.71,9222.71 v1(10929.02,9219.02)
  Bottom Layer w5: v1(10532.01,9390.02) 10549.28,9390.02 10570.28,9369.02 10648.28,9369.02 10651.01,9366.29 10651.01,9213.99 10657,9208 10693.43,9208 10700,9214.57 ; 10700.43,9215 10707.82,9222.4 10722.47,9222.4 10725.84,9219.02 ; 10726.55,9219.73 10727.26,9219.02 v1(10929.02,9219.02)
1WB+WR: CN2.5 CN3.14 | length 630.3
  Top Layer w5: CN3.14@11197.86,9004.59 11223.01,9004.59 11227.01,9008.59 ; 11227.01,9009.02 11267.78,9009.02 11290,9031.23 11290,9313.09 11315,9338.09 11315,9388 11305.5,9397.5 11285.51,9397.5 11267.01,9416 11267.01,9464.02 11257.01,9474.02 11257.01,9496.55 11257.01,9499.02 11246.09,9499.02 CN2.5@11246.09,9496.55
1WB_12V_TPP: IC1.C5 R31.1 | length 1037.6
  Top Layer w5: v1(10553.01,9061.02) 10576.37,9084.38 10588.37,9084.38 v1(10603.01,9099.02) ; v1(10558.01,9236.02) 10561.43,9232.6 IC1.C5@10561.43,9215.02 IC1.C5@10563.01,9215.02 ; R31.1@10975.07,9464.13 10975.07,9438.95 v1(10987.01,9427.02)
  Bottom Layer w5: v1@10553.01,9060.08 v1(10553.01,9061.02) 10553.01,9114.79 10558.01,9119.79 v1(10558.01,9236.02) ; v1(10603.01,9099.02) 10675.39,9099.02 10691.16,9114.79 10710.84,9114.79 10757.61,9068.02 10916.82,9068.02 10982,9133.2 10982,9422.01 v1(10987.01,9427.02)
1WW: IC2.2 JTAG1.7 R14.2 | length 3075.1
  Top Layer w5: JTAG1.7@10178.38,8629.21 10178.38,8561.9 10194.24,8546.04 10305.22,8546.04 10323.29,8564.1 10323.29,8686.9 10334.95,8698.56 10641.56,8698.56 10654.01,8711.01 10654.01,8905.67 10622.01,8937.67 10622.01,9028.02 10626,9032.01 10626,9072.02 10634,9080.02 10684,9080.02 10697.02,9067 v1(10727,9067) ; IC2.2@10833.01,9769.02 10833.01,9779.01 IC2.2@10835.6,9779.01 10893.01,9779.01 v1(10903.01,9769.02) 10903.01,9663.58 10918.57,9648.02 v1(10993.01,9648.02) ; R14.2@11196.92,10209.02 11196.92,10189.02 ; 11197.01,10189.02 11196.92,10189.02 ; v1(11207.01,10150.02) 11207.01,10178.93 11196.92,10189.02
  Bottom Layer w5: v1(10727,9067) 10745.9,9067 10753.89,9059.02 10920.55,9059.02 10991,9129.47 10991,9390 11022,9421 11022,9619.02 v1(10993.01,9648.02) ; v1(10903.01,9769.02) 10903.01,9802.39 10886.01,9819.39 10886.01,10138.4 10907.62,10160.02 11176.11,10160.02 11186.11,10150.02 v1(11207.01,10150.02)
3V3: C7.2 C8.2 C9.2 C10.1 C11.1 C12.1 IC1.A7 IC1.A16 IC1.E1 IC1.J18 IC1.L1 IC1.M16 IC1.R1 IC1.R2 IC1.R18 IC1.U3 IC1.U18 IC1.V5 IC1.V10 IC1.V14 IC1.V18 IC2.4 IC7.4 R1.2 R2.2 R3.2 R5.2 R7.2 R8.2 R9.2 R10.2 R11.2 R12.2 R13.2 R16.2 R22.2 R23.2 R24.2 R25.2 R26.2 R27.2 R28.2 R29.2 R34.2 R35.2 R41.2 R44.2 SDCARD1.4 | length 13029.2
  Top Layer w3: IC1.U18@10305.52,9490.61 10309.46,9490.61 10319.35,9480.72 10330.3,9480.72 10335.1,9475.92 10335.1,9401.98 IC1.M16@10344.89,9392.18 ; 10590.91,9516.79 10590.91,9500.5 IC1.U3@10600.8,9490.61 ; IC1.R2@10620.48,9451.24 10630.37,9441.35 10646.66,9441.35
  Top Layer w5: R41.2@9742.34,8856.95 9725.05,8856.95 9715,8867 9715,8969 9724.5,8978.5 ; R28.2@9831.15,9100.05 9803.2,9128 9770.29,9128 R29.2@9742.34,9100.05 9723.05,9100.05 9716,9093 9716,8987 9724.5,8978.5 ; v1(10103.01,9409.02) 10103.01,9429.02 10118.01,9444.02 10235.01,9444.02 10242.01,9451.02 IC1.R18@10303.01,9451.02 ; R23.2@10155.87,9813.97 10173.01,9813.97 10183.01,9803.97 ; R8.2@10186.37,8978.5 R7.2@10097.57,8978.5 R3.2@10008.76,8978.5 9965.49,8978.5 9946.01,8959.02 9811.98,8959.02 9792.5,8978.5 R27.2@9742.34,8978.5 9724.5,8978.5 ; R8.2@10186.37,8979.02 v1(10215.01,8979.02) 10253.75,8979.02 R11.2@10295.6,9020.86 10295.6,9036.43 10273.01,9059.02 10273.01,9170.88 10263.01,9180.88 v1(10263.01,9249.02) 10263.01,9323.56 10272.46,9333.02 IC1.J18@10305.52,9333.02 ; 10248,9600 10248.1,9599.9 ; v1(10292,9672) 10289.69,9669.69 C12.1@10289.69,9634.36 ; IC1.R18@10305.52,9451.24 10303.01,9451.24 IC1.R18@10303.01,9451.02 ; IC1.V18@10305.52,9510.29 10271.98,9543.84 10271.98,9567.02 10265.15,9573.85 R16.2@10248.36,9573.85 10248.36,9599.64 10248.1,9599.9 ; IC1.J18@10305.53,9333.02 IC1.J18@10305.52,9333.13 ; IC1.A16@10344.89,9175.65 10344.89,9117.13 10366.69,9095.33 R12.2@10366.69,9020.86 10384.51,9038.68 10439,9038.68 ; IC1.M16@10344.89,9392.18 10362.84,9392.18 v1(10366.01,9389.02) ; v1(10353,9672) 10367,9658 10389.59,9658 R5.2@10413.23,9634.36 ; IC1.V14@10384.01,9510.29 10384.01,9509.02 10384.26,9509.02 IC1.V14@10384.26,9510.29 10384.26,9544.76 10350.01,9579.02 10320.01,9579.02 10289.69,9609.34 C12.1@10289.69,9634.36 ; R26.2@10424.49,8783.71 10443.47,8783.71 10453.01,8774.18 ; R10.2@10437.79,9020.86 10437.79,9037.47 10439,9038.68 ; v1(10453.01,8719.02) 10453.01,8774.18 ; IC1.V10@10463,9510.29 10463,9609.02 10473.01,9619.02 10473.01,9772.33 10431.37,9813.97 R2.2@10334.96,9813.97 ; IC1.A7@10522.06,9175.65 10522.01,9175.59 10522.01,9141.02 10483,9102.01 10483,9038.68 ; 10532.67,9038.68 10483,9038.68 ; 10533.01,9039.02 10551.16,9020.86 R9.2@10579.97,9020.86 10599.66,9020.86 10612.01,9008.52 ; IC1.V5@10561.43,9510.29 10561.43,9530.6 10552.01,9540.02 10552.01,9568.02 10583.01,9599.02 10614.49,9599.02 ; 10590.91,9516.79 10590.91,9529.65 10601.01,9539.75 10601.01,9563.01 10610,9572 10610,9584.99 10610.01,9594.54 10614.49,9599.02 ; IC1.E1@10640.17,9254.39 10640.17,9254.02 C11.1@10766.97,9254.02 ; IC1.L1@10640.17,9372.02 IC1.L1@10640.17,9372.5 10670.49,9372.5 10699.01,9401.02 10699.01,9455.27 10670.5,9483.78 ; IC1.R1@10640.17,9449.02 IC1.R1@10640.17,9451.24 10656.38,9451.24 10660,9454.85 10660,9494.28 ; 10646.66,9441.35 10660.66,9441.35 10670.5,9451.19 10670.5,9483.78 ; C10.1@10671.49,9717.99 10671.49,9656.02 10614.49,9599.02 ; C10.1@10676.05,9713.42 10713.01,9676.47 v1(10713.01,9662.02) ; v1(10707.01,9089.02) 10628.02,9089.02 10617,9078 10617,9038.01 10612.01,9033.02 10612.01,9008.52 ; v1(10733.01,9496.02) 10733.01,9477 10727.01,9471 10727.01,9358 10734.03,9350.97 C8.2@10772.84,9350.97 10772.84,9328.49 10752.01,9307.66 10752.01,9268.98 C11.1@10766.97,9254.02 ; R35.2@10772.84,9203.07 C11.1@10772.84,9248.15 C11.1@10766.97,9254.02 ; C7.2@10772.84,9515.8 v1@10772.84,9548.85 ; v1(10773.01,9549.02) 10751.65,9570.37 10751.65,9599.37 10742,9609.02 10723,9609.02 10703,9589.02 10677.02,9589.02 10662.01,9574 10662.01,9539.09 10660,9537.08 10660,9494.28 ; C8.2@10773.37,9350.43 R24.2@10826.95,9350.43 ; v1(10966,9060) 10929,9097 10929,9150 10923,9156 10923,9173.27 10968.71,9218.98 10995.73,9218.98 11010.75,9234 11056.87,9234 R25.2@11079.37,9256.51 ; v1(10973,8917) 10997,8917 11014,8900 11082.05,8900 R34.2@11106.93,8924.88 ; IC2.4@10985.6,9729.01 11014.51,9729.01 v1@11032.76,9747.26 ; v1(10993.01,9679.02) 11020.8,9679.02 11033.01,9691.22 v1(11033.01,9747.02) ; v1@11033.01,9747.5 11033.01,9838.02 11022.01,9849.02 10803.01,9849.02 10733.01,9919.02 10360.83,9919.02 10334.95,9893.14 R2.2@10334.96,9813.97 ; R13.2@11335.22,10209.02 11352.78,10191.46 11352.78,10111.95 11325.84,10085.02 11325.84,10030.83 11408.01,9948.67 v1(11408.01,9904.02) ; 10183.01,9803.97 10183.01,9670 10210,9643.01 10210,9610.9 10221,9599.9 10248.1,9599.9 ; 10183.01,9803.97 10193.01,9813.97 R22.2@10215.89,9813.97 R1.2@10274.93,9813.97 R2.2@10334.96,9813.97 ; 10248.1,9599.9 10252.09,9599.9 10257.01,9604.82 10257.01,9623.02 10268.35,9634.36 C12.1@10289.69,9634.36 ; IC1.R18@10303.01,9451.02 10303.01,9450.02 10305.52,9450.02 10306.01,9450.02 10305.15,9450.87 10305.01,9451.02 IC1.R18@10303.01,9451.02 ; 10439,9038.68 10483,9038.68 ; 10453.01,8774.18 10463.01,8784.18 C9.2@10476.65,8784.18 10493.01,8784.18 10493.52,8783.67 R44.2@10528.81,8783.67 10553.01,8783.67 10566.27,8770.4 IC7.4@10610.47,8770.4 10634.39,8770.4 10645.01,8781.02 10645.01,8901.94 10612.01,8934.94 10612.01,9008.52 ; 10660,9494.28 10670.5,9483.78
  Bottom Layer w5: v1(10103.01,9409.02) 10180.28,9409.02 10192.01,9397.29 10192.01,9223.02 10199.22,9215.8 10205.01,9210.02 10255.01,9210.02 10263.01,9218.02 v1(10263.01,9249.02) 10263.01,9319.35 10273.33,9329.68 SDCARD1.4@10323.11,9329.68 ; v1(10215.01,8979.02) 10364.82,8979.02 10390.01,8953.83 10390.01,8766.56 10437.55,8719.02 v1(10453.01,8719.02) ; v1(10292,9672) 10312,9652 10312,9589 10324,9577 10352,9577 10353,9578 v1(10353,9672) ; SDCARD1.4@10343.01,9389.02 v1(10366.01,9389.02) ; v1(10707.01,9089.02) 10707.01,9005.02 10733.01,8979.02 10866.01,8979.02 10950.99,9064 ; v1(10713.01,9662.02) 10713.01,9579.02 10723.01,9569.02 10750.28,9569.02 10931.26,9750 10931.26,9786.86 10895.01,9823.11 10895.01,10134.67 10911.35,10151.02 11172.38,10151.02 11194.38,10129.02 11323.01,10129.02 11347.01,10105.02 11347.01,9908.52 11351.5,9904.02 ; v1(10733.01,9496.02) 10766.36,9496.02 10773.01,9502.66 v1(10773.01,9549.02) 10773.01,9566.29 10916.73,9710.02 10987.44,9710.02 10993.01,9704.45 v1(10993.01,9679.02) ; v1(10966,9060) 10950.99,9064 ; v1(10973,8917) 10939.46,8917 10907,8949.46 10907,8994.56 10941.44,9029 10987.53,9029 11014,9055.47 11014,9098.09 10999.54,9112.55 ; 10993.01,9704.95 10998.07,9710.02 11087.73,9710.02 11107.01,9690.75 11107.01,9651 11040,9583.99 11040,9413.54 11009,9382.54 11009,9122.01 10999.54,9112.55 ; v1(11033.01,9747.02) 11099.28,9747.02 11120.28,9768.02 11293.16,9768.02 11344.54,9819.39 11344.54,9886.25 11351.5,9893.22 11351.5,9904.02 ; v1(11408.01,9904.02) 11351.5,9904.02 ; 10950.99,9064 10956.49,9069.51 10999.54,9112.55